# Altium PCB PCB1.PcbDoc
Units mm, origin at the board's own origin, x right, y up, seen from the top; angles counter-clockwise.
Board outline 211.71 x 173.35 mm, 3 copper layers (Top Layer, Internal Plane 1, Bottom Layer); 80 components, 62 nets, 256 pads, 0 vias.
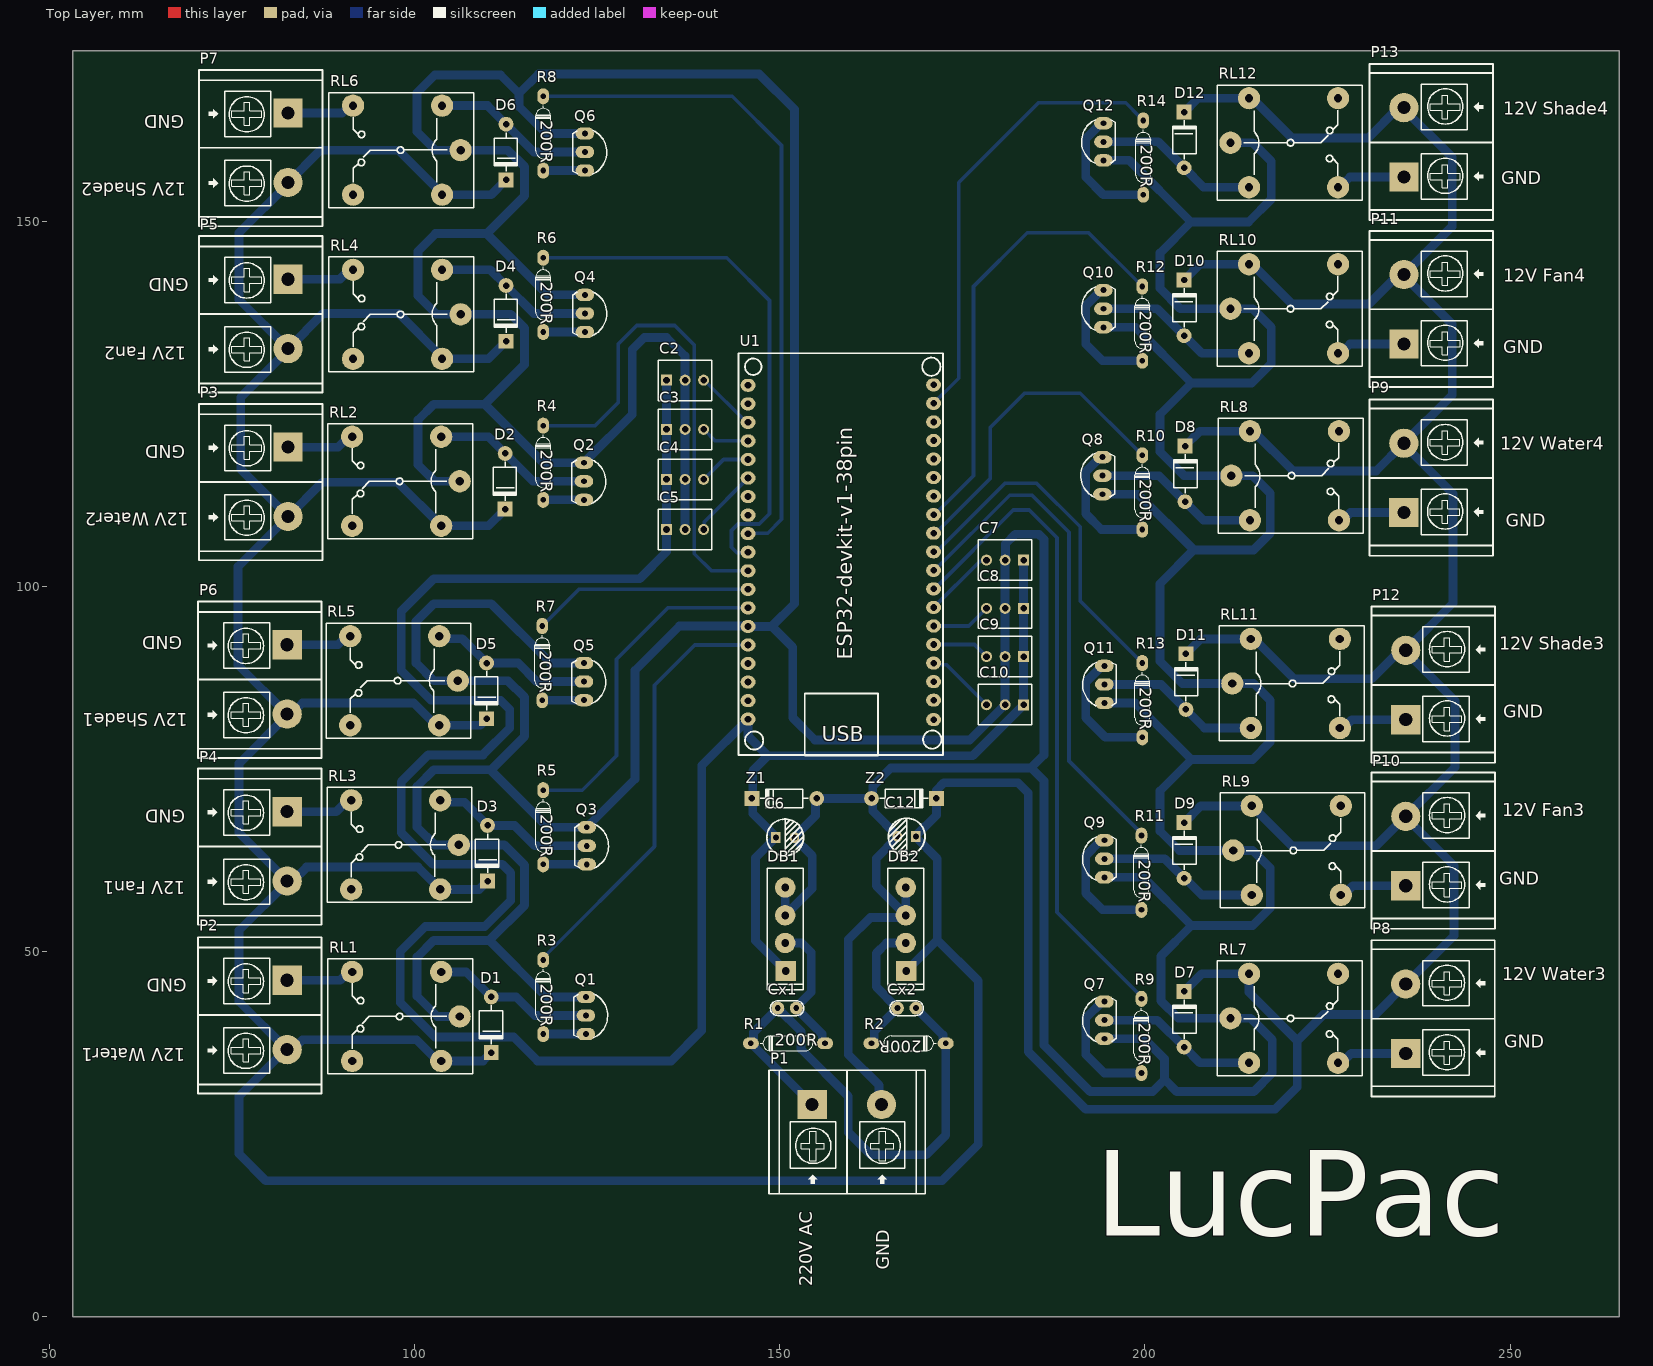
[diagram p0: Top Layer view]
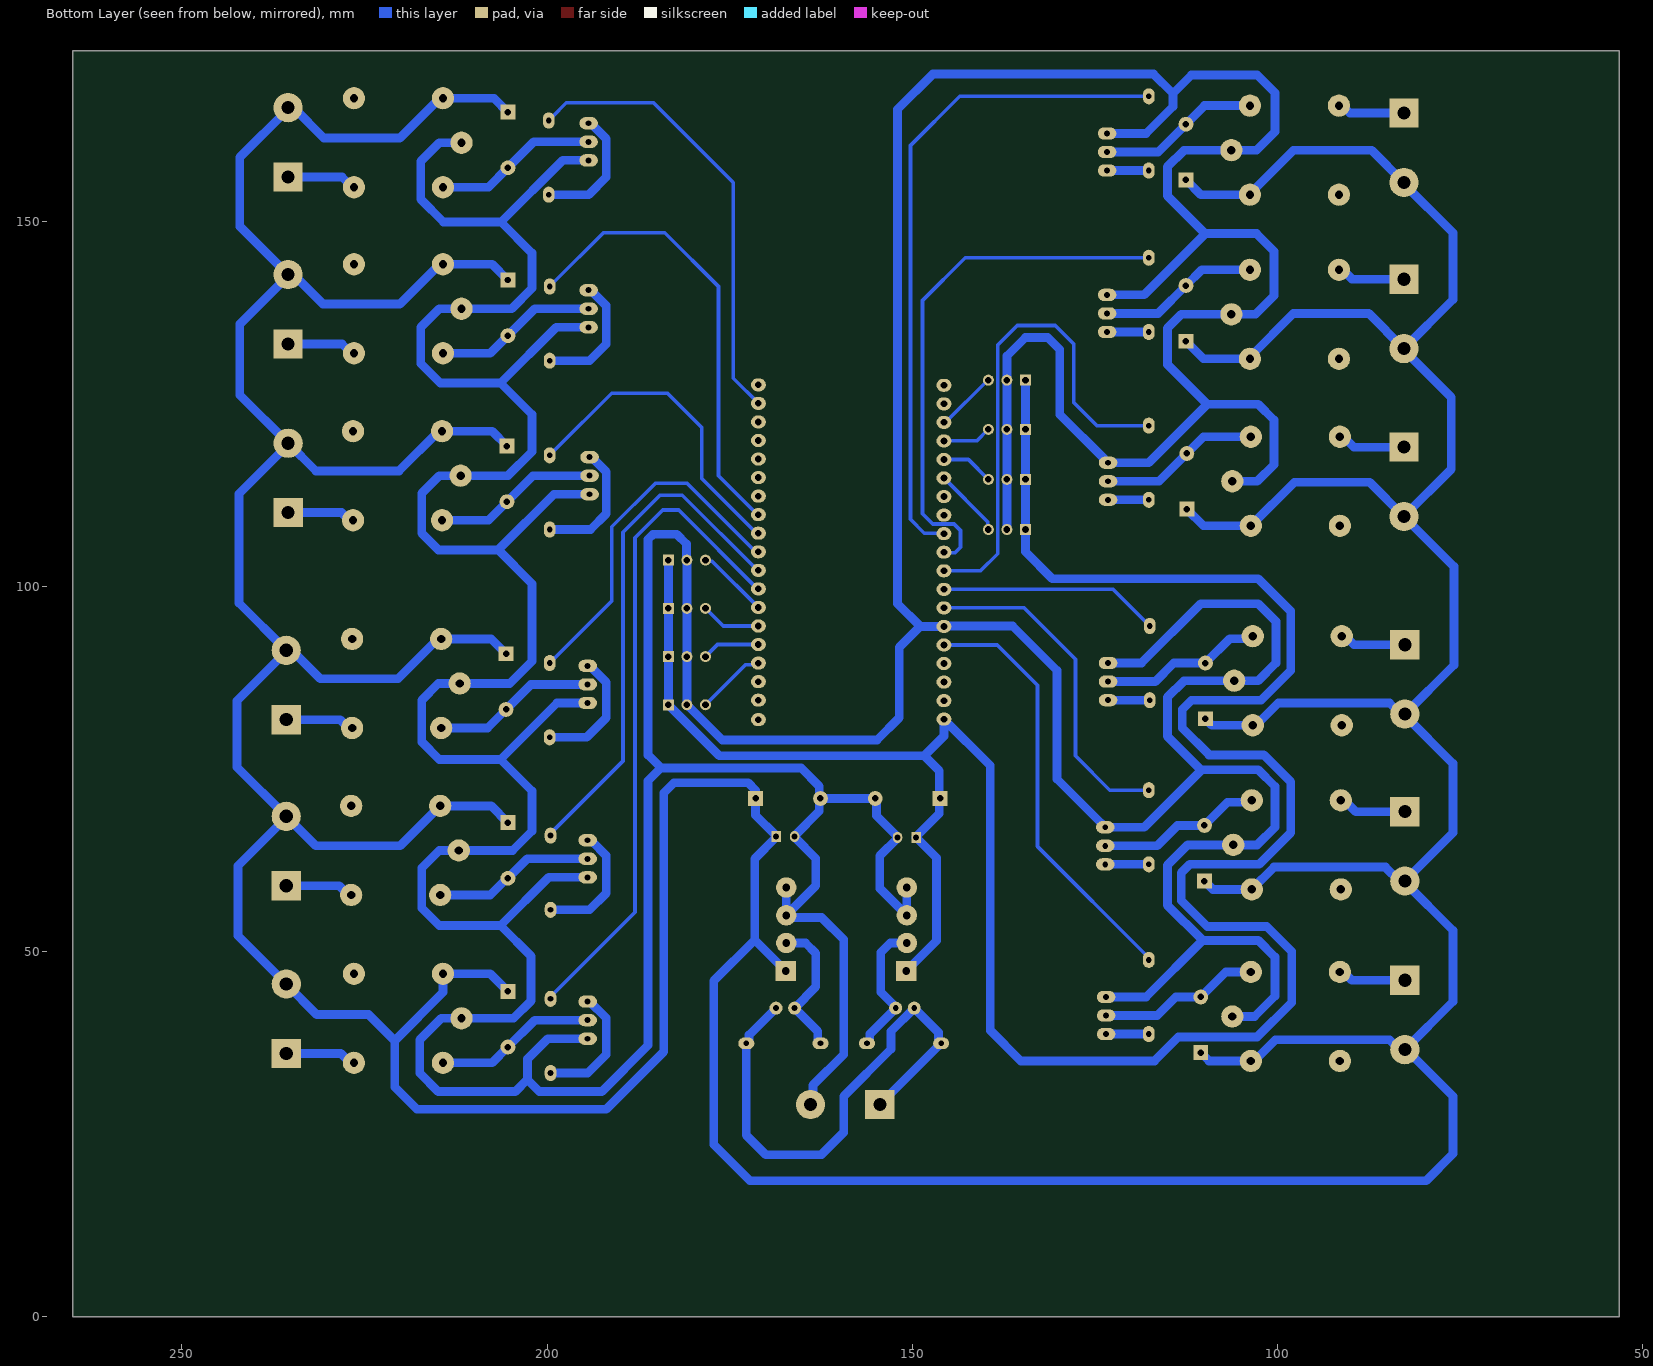
[diagram p1: Bottom Layer view, seen from below]
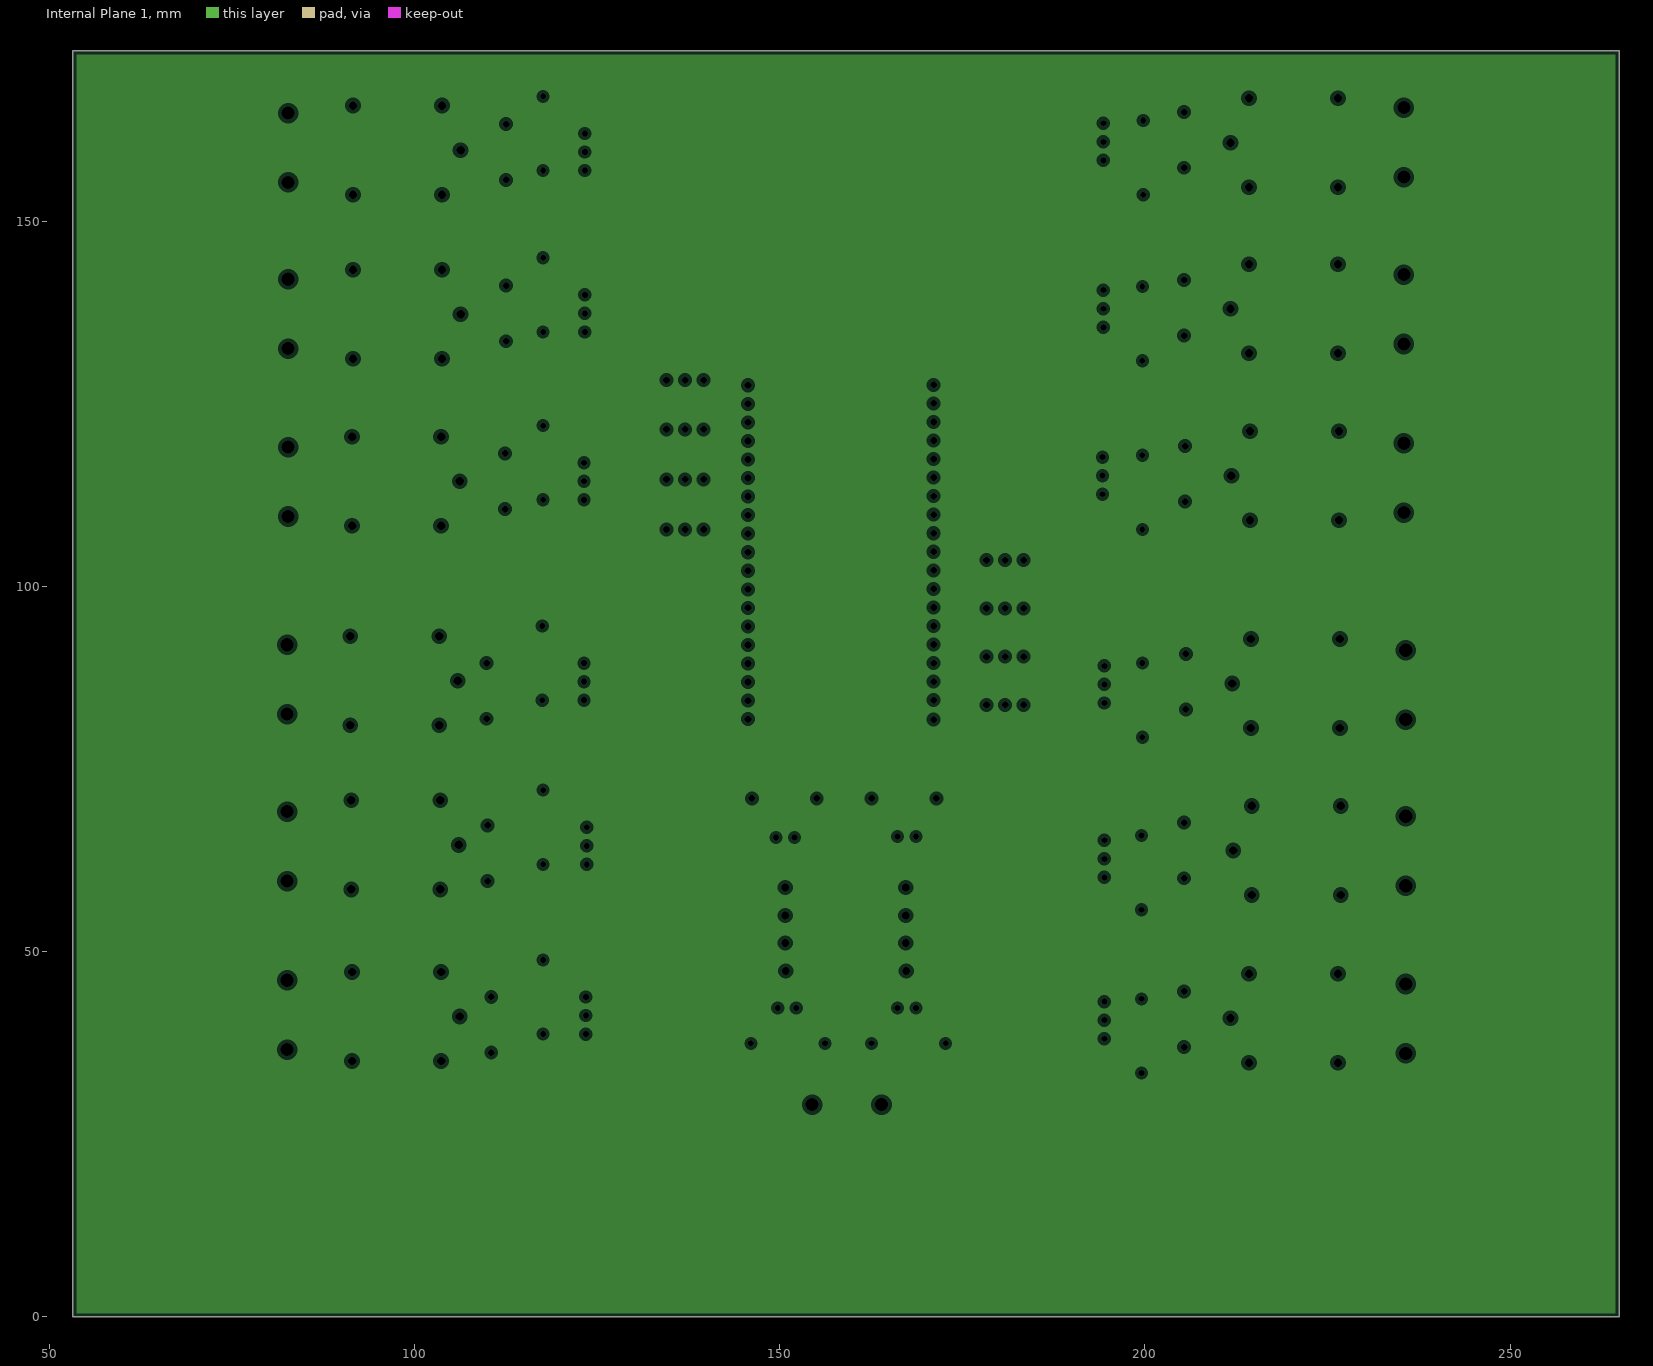
[diagram p2: Internal Plane 1, clearances drawn from the general rule]
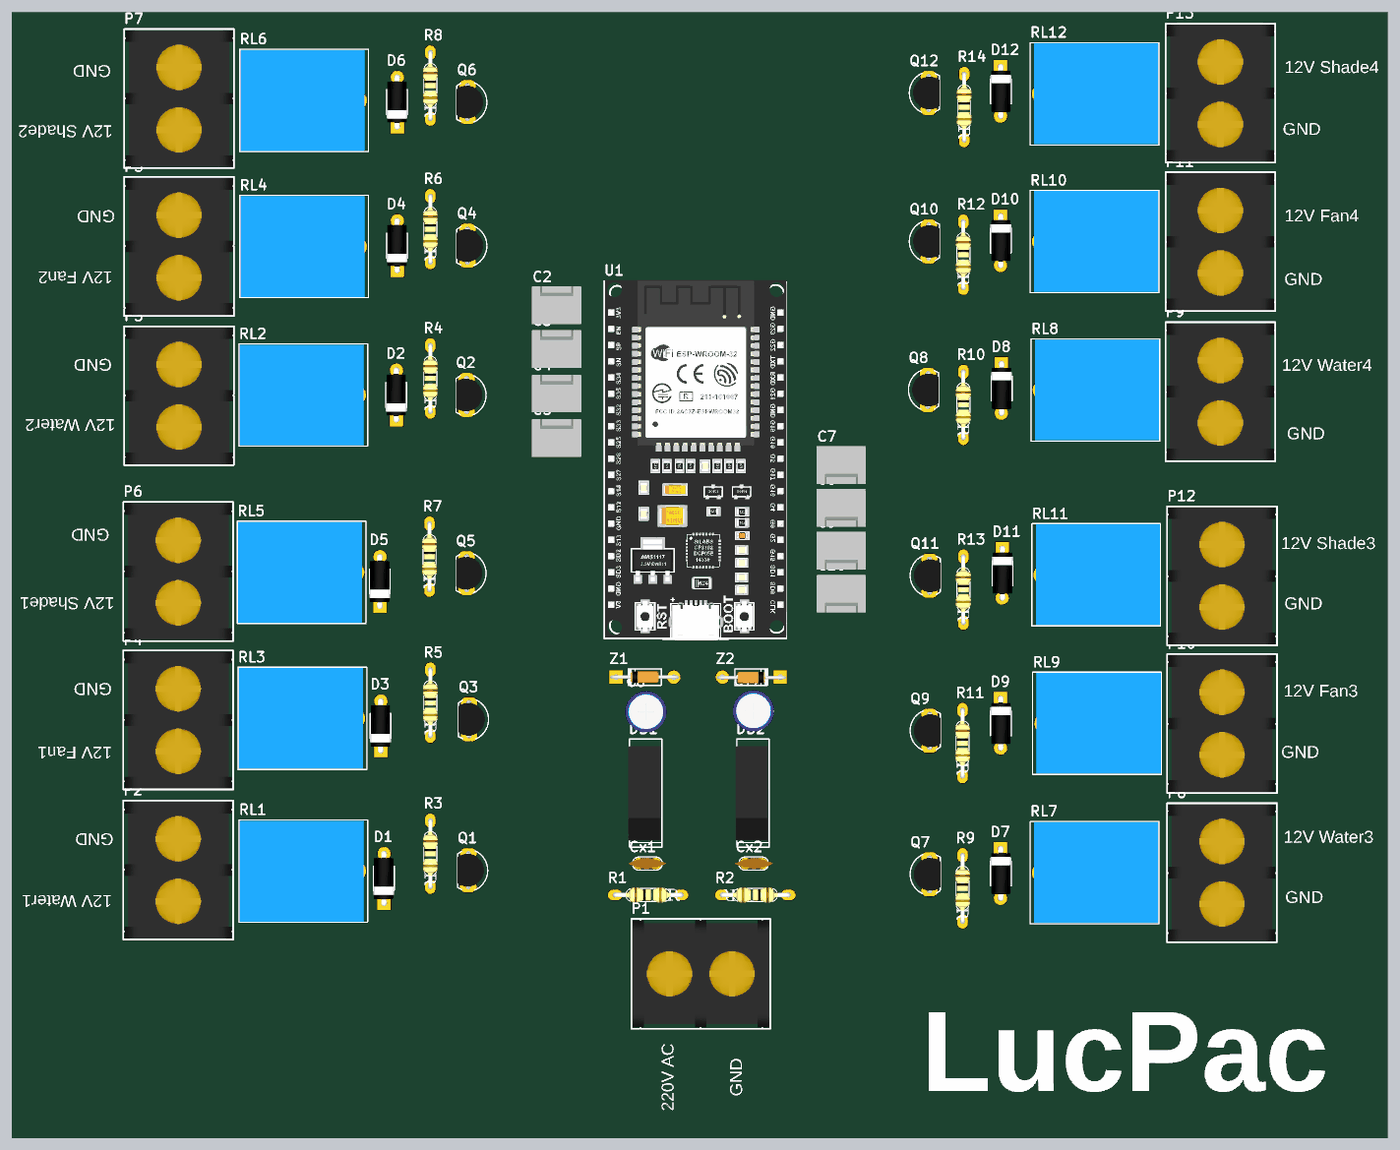
[diagram p3: 3D render of the assembled board from above, using the file's embedded part models]

## Layer stack, top to bottom
Top Solder: solder mask 0.0102, Solder Resist, Dk 3.5
Top Layer: signal copper 0.0356
Dielectric 1: dielectric 0.32, FR-4, Dk 4.8
Internal Plane 1: plane copper 0.0356
Dielectric2: dielectric 0.32, FR-4, Dk 4.8
Bottom Layer: signal copper 0.0356
Bottom Solder: solder mask 0.0102, Solder Resist, Dk 3.5

## Board outline
264.922,0 264.922,173.355 53.213,173.355 53.213,0

## Design rules (kind name [scope] priority, off if disabled: settings)
Clearance [All] p1: gap=0 ignorepadtopadclearanceinfootprint=FALSE
PlaneClearance [All] p1: clearance=0.508
PlaneConnect [All] p1: planeconnectstyle=Relief reliefexpansion=0.508 reliefentries=4 reliefconductorwidth=0.254 reliefairgap=0.254
PolygonConnect [All] p1: connectstyle=Relief reliefconductorwidth=0.254 reliefentries=4 polygonreliefangle="90 Angle" airgapwidth=0.254
RoutingVias [All] p1: holewidth=0.711 width=1.27 viastyle="Through Hole" minholewidth=0.711 minwidth=1.27 maxholewidth=0.711 maxwidth=1.27
SilkToSilkClearance [All] p1: silktosilkclearance=0
SilkToSolderMaskClearance [IsText] p1: minsilkscreentomaskgap=0 clearancetoexposedcopper=TRUE
SolderMaskExpansion [All] p1: expansion=0.102 istentingtop=FALSE
Width [All] p1: maxlimit=5 minlimit=0.3 preferedwidth=1.2
26 further rules are at their usual default settings.

## Components (designator, comment, footprint, x,y, rotation, side; value= is the part's Value field where it differs from the comment)
C2 "Header3" HDR3 134.493,128.27 r0 top
C3 "Header3" HDR3 134.493,121.539 r0 top
C4 "Header3" HDR3 134.493,114.681 r0 top
C5 "Header3" HDR3 134.493,107.823 r0 top
C6 "100uF" "tu hoa 5mm" 150.741,65.659 r0 top
C7 "Header3" HDR3 183.388,103.632 r180 top
C8 "Header3" HDR3 183.388,97.028 r180 top
C9 "Header3" HDR3 183.388,90.424 r180 top
C10 "Header3" HDR3 183.388,83.82 r180 top
C12 "100uF" "tu hoa 5mm" 167.378,65.786 r180 top
Cx1 "1uF" CN1 150.995,42.291 r0 top value=33pF
Cx2 "1uF" CN1 167.378,42.291 r180 top value=33pF
D1 "100v" "DIODE 1A" 110.49,45.085 r90 top
D2 "100v" "DIODE 1A" 112.395,119.507 r90 top
D3 "100v" "DIODE 1A" 109.982,68.58 r90 top
D4 "100v" "DIODE 1A" 112.522,142.494 r90 top
D5 "100v" "DIODE 1A" 109.855,90.805 r90 top
D6 "100v" "DIODE 1A" 112.522,164.592 r90 top
D7 "100v" "DIODE 1A" 205.359,35.687 r270 top
D8 "100v" "DIODE 1A" 205.486,110.363 r270 top
D9 "100v" "DIODE 1A" 205.359,58.801 r270 top
D10 "100v" "DIODE 1A" 205.359,133.096 r270 top
D11 "100v" "DIODE 1A" 205.613,81.915 r270 top
D12 "100v" "DIODE 1A" 205.359,156.083 r270 top
DB1 "Diode Brideg" "CAU 1A" 150.766,47.371 r90 top value="Cau 1A"
DB2 "Diode Brideg" "CAU 1A" 167.276,47.371 r90 top value="Cau 1A"
P1 "HB9500-2P" HB9500-2P 154.432,29.083 r0 top
P2 "HB9500-2P" HB9500-2P 82.55,46.101 r270 top
P3 "HB9500-2P" HB9500-2P 82.677,119.101 r270 top
P4 "HB9500-2P" HB9500-2P 82.55,69.19 r270 top
P5 "HB9500-2P" HB9500-2P 82.677,142.088 r270 top
P6 "HB9500-2P" HB9500-2P 82.55,92.05 r270 top
P7 "HB9500-2P" HB9500-2P 82.677,164.846 r270 top
P8 "HB9500-2P" HB9500-2P 235.704,36.093 r90 top
P9 "HB9500-2P" HB9500-2P 235.45,110.134 r90 top
P10 "HB9500-2P" HB9500-2P 235.712,59.055 r90 top
P11 "HB9500-2P" HB9500-2P 235.458,133.223 r90 top
P12 "HB9500-2P" HB9500-2P 235.712,81.788 r90 top
P13 "HB9500-2P" HB9500-2P 235.458,156.083 r90 top
Q1 "C1815" TO92 123.444,41.275 r270 top value=C9014
Q2 "C1815" TO92 123.19,114.427 r270 top value=C9014
Q3 "C1815" TO92 123.571,64.516 r270 top value=C9014
Q4 "C1815" TO92 123.317,137.414 r270 top value=C9014
Q5 "C1815" TO92 123.19,86.995 r270 top value=C9014
Q6 "C1815" TO92 123.317,159.512 r270 top value=C9014
Q7 "C1815" TO92 194.437,40.64 r90 top value=C9014
Q8 "C1815" TO92 194.183,115.189 r90 top value=C9014
Q9 "C1815" TO92 194.437,62.738 r90 top value=C9014
Q10 "C1815" TO92 194.31,138.049 r90 top value=C9014
Q11 "C1815" TO92 194.437,86.614 r90 top value=C9014
Q12 "C1815" TO92 194.31,160.909 r90 top value=C9014
R1 "100K" "DIEN TRO 1/4 W" 146.042,37.465 r0 top value=R
R2 "100K" "DIEN TRO 1/4 W" 172.712,37.465 r180 top value=R
R3 "500" "DIEN TRO 1/4 W" 117.602,48.895 r270 top value=R
R4 "500" "DIEN TRO 1/4 W" 117.602,122.047 r270 top value=R
R5 "500" "DIEN TRO 1/4 W" 117.602,72.136 r270 top value=R
R6 "500" "DIEN TRO 1/4 W" 117.602,145.034 r270 top value=R
R7 "500" "DIEN TRO 1/4 W" 117.475,94.615 r270 top value=R
R8 "500" "DIEN TRO 1/4 W" 117.602,167.132 r270 top value=R
R9 "500" "DIEN TRO 1/4 W" 199.517,43.561 r270 top value=R
R10 "500" "DIEN TRO 1/4 W" 199.644,117.983 r270 top value=R
R11 "500" "DIEN TRO 1/4 W" 199.517,65.913 r270 top value=R
R12 "500" "DIEN TRO 1/4 W" 199.644,141.097 r270 top value=R
R13 "500" "DIEN TRO 1/4 W" 199.644,89.535 r270 top value=R
R14 "500" "DIEN TRO 1/4 W" 199.771,163.83 r270 top value=R
RL1 "Relay 10A/12V" "RELAY 5" 97.917,41.148 r180 top value="Relay SPDT, 10A, 12V"
RL2 "Relay 10A/12V" "RELAY 5" 97.917,114.427 r180 top value="Relay SPDT, 10A, 12V"
RL3 "Relay 10A/12V" "RELAY 5" 97.79,64.643 r180 top value="Relay SPDT, 10A, 12V"
RL4 "Relay 10A/12V" "RELAY 5" 98.044,137.287 r180 top value="Relay SPDT, 10A, 12V"
RL5 "Relay 10A/12V" "RELAY 5" 97.663,87.122 r180 top value="Relay SPDT, 10A, 12V"
RL6 "Relay 10A/12V" "RELAY 5" 98.044,159.766 r180 top value="Relay SPDT, 10A, 12V"
RL7 "Relay 10A/12V" "RELAY 5" 219.964,40.894 r0 top value="Relay SPDT, 10A, 12V"
RL8 "Relay 10A/12V" "RELAY 5" 220.091,115.189 r0 top value="Relay SPDT, 10A, 12V"
RL9 "Relay 10A/12V" "RELAY 5" 220.345,63.881 r0 top value="Relay SPDT, 10A, 12V"
RL10 "Relay 10A/12V" "RELAY 5" 219.964,138.049 r0 top value="Relay SPDT, 10A, 12V"
RL11 "Relay 10A/12V" "RELAY 5" 220.218,86.741 r0 top value="Relay SPDT, 10A, 12V"
RL12 "Relay 10A/12V" "RELAY 5" 219.964,160.782 r0 top value="Relay SPDT, 10A, 12V"
U1 "ESP32-DEVKI-V1.0-PIN38" ESP32-DEVKIT-V1.0-38PIN 158.361,104.394 r0 top
Z1 "5.1V" D1A 155.067,70.993 r0 top
Z2 "12V" D1A 162.56,70.993 r180 top

## Footprints (in the part's own frame and the unit in brackets; to place one, negate y for a bottom-side part, rotate by r counter-clockwise, add the part's x,y. Pads: shape width x height; smd on the part's side, far side on the other; paste and mask are expansions set on the pad)
"CAU 1A" [mil] "CAU 1A DET"
  rect 110x110 hole 42: 1(0,-2)
  round 110 hole 42: 2(151,1) 3(300,1) 4(450,1)
  silkscreen extent -101,-97 555,99, body extent -62,-90 512,107, height 453
CN1 [mil]
  round 70 hole 31: 1(-50,0) 2(50,0)
  silkscreen extent -90,-40 91,40, body extent -115,-33 115,33, height 265
D1A [mil] "Diode 1A, W 100mil, L 350mil"
  round 80 hole 35: 1(0,0)
  rect 80x80 hole 35: 2(-350,0)
  silkscreen extent -305,-50 -45,50, body extent -386,-33 34,36, height 84
"DIEN TRO 1/4 W" [mm]
  oval 2.2x1.6 hole 0.787: 1(0,0) 2(10.16,0)
  silkscreen extent 1.26,-1.02 8.88,1.02, body extent -0.3,-1.16 10.46,1.16, height 2.93
"DIODE 1A" [mil] "Diode 1A"
  round 80 hole 35: 1(-50,0)
  rect 80x80 hole 35: 2(-350,0)
  silkscreen extent -305,-61 -95,65, body extent -366,-61 -34,65, height 122
ESP32-DEVKIT-V1.0-38PIN [mil] "DEVKIT 38 PIN"
  oval 80x70 hole 36: 1(-500,912.59) 2(-500,812.59) 3(-500,712.59) 4(-500,612.59) 5(-500,512.59) 6(-500,412.59) 7(-500,312.59) 8(-500,212.59) 9(-500,112.59) 10(-500,12.59) 11(-500,-87.41) 12(-500,-187.41) 13(-500,-287.41) 14(-500,-387.41) 15(-500,-487.41) 16(-500,-587.41) 17(-500,-687.41) 18(-500,-787.41) 19(-500,-887.41) 20(500,-890.09) 21(500,-785.09) 22(500,-685.09) 23(500,-585.09) 24(500,-485.09) 25(500,-385.09) 26(500,-285.09) 27(500,-185.09) 28(500,-85.09) 29(500,14.91) 30(500,114.91) 31(500,214.91) 32(500,314.91) 33(500,414.91) 34(500,514.91) 35(500,614.91) 36(500,714.91) 37(500,814.91) 38(500,914.91)
  silkscreen extent -551,-1085 551,1085, body extent -547,-1092 555,1092, height 269
HB9500-2P [mm]
  rect 4x4 hole 1.8: 1(0,0)
  round 4 hole 1.8: 2(9.5,0)
  silkscreen extent -5.9,-12.2 15.49,4.7, body extent -5.72,-12 15.32,4.5, height 18.51
HDR3 [mm] "Connector; Header; 3 Position"
  rect 1.5x1.5 hole 0.9: 1(0,0)
  round 1.5 hole 0.9: 2(2.54,0) 3(5.08,0)
  silkscreen extent -1.14,-2.79 6.22,2.74, body extent -1.27,-2.92 6.35,2.88, height 11.72
"RELAY 5" [mil] "Reley DPDT, 8 pin, 1A, W400mil, L800mil,H 300mil"
  round 120 hole 45: 1(-325,0) 2(255,240) 3(255,-240) 4(-225,-240) 5(-225,240)
  silkscreen extent -395,-310 385,310, body extent -371,-304 381,306, height 602
TO92 [mil] "TO-92"
  oval 66x100 hole 32: 1(-100,0) 2(0,0) 3(100,0)
  silkscreen extent -117,-65 120,118, body extent -109,-66 109,95, height 245
"tu hoa 5mm" [mm]
  rect 1.3x1.5 hole 0.8: 1(-1.27,0)
  oval 1.3x1.5 hole 0.8: 2(1.27,0)
  silkscreen extent -2.51,-2.51 2.51,2.51, body extent -3.12,-3.18 3.23,3.18, height 14.55

## Part data
C2 C3 C4 C5 C7 C8 C9 C10: "Header IDC, 3 x 1 Pin Vertical 2.54mm Pitch (Non-Boxed, Male)", Manufacturer="W¨¹rth Elektronik eiSos GmbH", partNo=613002143121, ComponentLink1 Description=Manufacturer, ComponentLink1URL=http://www.we-online.com, ComponentLink2 Description=Datasheet, ComponentLink2URL=http://katalog.we-online.de/em/datasheet/6130xx143121.pdf, Created by="Karrer Zheng", Created Date="29 March 2013", NoPins=02
C6 C12: library part "Tu Hoa 100uF 16V 5x7", "Cắm", Chung_Loai=Cắm, Don_Vi=Con, Ma_Hang=MH001347, So_Chan=2, Ten_Linh_Kien="Tụ Hóa 100uF 16V 5x7MM"
Cx1 Cx2: library part CAP-DIP, "Cremic For Xtal 1pF => 100pF"
D1 D2 D3 D4 D5 D6 D7 D8 D9 D10 D11 D12: library part "Diode 1N4007", "Cắm", Chung_Loai=Cắm, Don_Vi=Con, Ma_Hang=MH001063, Ten_Linh_Kien="Diode 1N4007 1A (DIP)"
DB1 DB2: library part DB, "Convert AC to DC voltage, 4 pin"
P1 P2 P3 P4 P5 P6 P7 P8 P9 P10 P11 P12 P13: "Terminal Block, Header, 2P, 15A, 300VAC Rohs Compliant: Yes"
Q1 Q2 Q3 Q4 Q5 Q6 Q7 Q8 Q9 Q10 Q11 Q12: library part "Trans C1815 DIP", "NPN transistor"
R1 R2 R3 R4 R5 R6 R7 R8 R9 R10 R11 R12 R13 R14: library part "Res 1/4 W", "Resistor", LatestRevisionDate=17-Jul-2002, LatestRevisionNote="Re-released for DXP Platform.", PackageReference=AXIAL-0.4, Published=8-Jun-2000, Publisher="Altium Limited"
RL1 RL2 RL3 RL4 RL5 RL6 RL7 RL8 RL9 RL10 RL11 RL12: library part "Relay 5", "Relay SPDT,10A - 12VDC 5 Pin"
Z1 Z2: library part "Diode Zener", "Diode  Zener"

## Nets (pads, with @x,y where several pads share a name; then routed paths per layer and width w, separated by ;. In a path a pad name is that pad's centre, name@x,y a point inside that pad or via, vN(x,y) a via of type N, cw(c..) or ccw(c..) an arc to the next point about the centre after c; other vN are vias at no path point)
5V: C2.1 C3.1 C4.1 C5.1 C6.1 C7.1 C8.1 C9.1 C10.1 DB1.1 U1.19 Z1.2 | length 351.9
  Bottom Layer w1.2: C2.1 C3.1 C4.1 C5.1 134.493,104.775 130.81,101.092 102.616,101.092 98.171,96.647 98.171,88.519 102.235,84.455 111.76,84.455 113.03,83.185 113.03,80.645 109.347,76.962 101.854,76.962 98.171,73.279 98.171,66.294 102.489,61.976 112.014,61.976 113.157,60.833 113.157,57.023 109.601,53.467 101.473,53.467 98.044,50.038 98.044,43.053 102.743,38.354 113.538,38.354 116.84,35.052 135.128,35.052 139.319,39.243 139.319,75.512 U1.19 145.661,79.51 148.336,76.835 ; DB1.1 146.685,51.503 146.685,62.873 C6.1 149.421,65.709 149.421,65.809 146.296,68.934 146.296,70.874 Z1.2 146.304,71.12 146.304,74.803 148.336,76.835 ; C7.1 C8.1 C9.1 C10.1 176.403,76.835 148.336,76.835
12V: C12.1 D1.2 D2.2 D3.2 D4.2 D5.2 D6.2 D7.2 D8.2 D9.2 D10.2 D11.2 D12.2 DB2.1 P2.2 P3.2 P4.2 P5.2 P6.2 P7.2 P8.2 P9.2 P10.2 P11.2 P12.2 P13.2 RL1.5 RL2.5 RL3.5 RL4.5 RL5.5 RL6.5 RL7.5 RL8.5 RL9.5 RL10.5 RL11.5 RL12.5 Z2.2 | length 980.9
  Bottom Layer w1.2: RL1.5@103.179,35.052 100.258,37.973 84.653,37.973 83.281,36.601 P2.2 ; RL1.5 109.347,35.052 D1.2 ; D5.2 108.966,81.026 RL5.5 102.925,81.026 99.877,84.074 84.653,84.074 83.129,82.55 P6.2 ; D3.2 108.839,58.547 RL3.5 100.457,61.595 85.213,61.595 83.308,59.69 P4.2 ; D2.2 110.109,108.331 RL2.5 97.663,114.3 87.376,114.3 P3.2 ; D4.2 110.109,131.191 RL4.5 103.759,131.445 97.79,137.414 87.503,137.414 P5.2 ; D6.2 110.49,153.67 RL6.5 103.759,153.797 97.79,159.766 87.097,159.766 P7.2 82.677,155.172 75.946,148.441 75.946,139.319 P5.2 ; DB2.1 171.577,51.621 ; D7.2 207.772,46.99 RL7.5 214.249,44.45 220.853,37.846 ; D9.2 207.645,69.977 RL9.5 220.091,64.516 231.673,64.516 P10.2 ; D10.2 207.518,144.145 RL10.5 214.702,144.145 220.163,138.684 230.661,138.684 234.7,142.723 P11.2 ; D12.2 207.264,166.878 RL12.5 214.702,166.878 220.163,161.417 230.534,161.417 234.7,165.583 P13.2 235.458,165.409 242.062,158.805 242.062,149.327 P11.2 ; D8.2 207.518,121.285 RL8.5 214.829,121.285 220.29,115.824 231.64,115.824 P9.2 ; D11.2 207.645,92.837 RL11.5 214.956,92.837 220.417,87.376 231.042,87.376 234.954,91.288 P12.2 ; P2.2 82.321,36.601 75.946,30.226 75.946,22.352 79.629,18.669 172.212,18.669 177.165,23.622 177.165,46.033 171.577,51.621 ; P2.2 75.946,43.205 75.946,52.912 82.55,59.516 P4.2 ; P4.2 75.946,66.294 75.946,75.772 82.55,82.376 P6.2 ; P6.2 75.819,89.281 75.819,102.743 P3.2 ; P3.2 76.2,116.078 76.2,125.937 82.677,132.414 P5.2 ; 171.577,51.621 171.577,62.757 168.648,65.686 C12.1 168.698,65.836 168.698,65.955 171.45,68.707 Z2.2 171.45,72.136 172.466,73.152 182.626,73.152 184.023,71.755 184.023,36.322 191.897,28.448 217.805,28.448 220.853,31.496 220.853,37.846 ; 220.853,37.846 224.409,41.402 231.513,41.402 P8.2 242.316,52.205 242.316,61.777 235.712,68.381 P10.2 ; P9.2 242.062,126.246 242.062,135.945 235.458,142.549 P11.2 ; P9.2 235.45,119.46 242.189,112.721 242.189,97.765 P12.2 ; P10.2 242.443,75.286 242.443,84.383 235.712,91.114 P12.2
220V: Cx1.1 Cx2.1 P1.1 R1.1 R2.1 | length 74.2
  Bottom Layer w1.2: R1.1 R1.1@146.234,37.465 ; P1.1 146.419,37.096 146.419,37.28 R1.1@146.234,37.465 ; Cx2.1 172.335,38.604 172.335,37.65 172.52,37.465 R2.1 172.712,24.884 170.053,22.225 162.433,22.225 159.385,25.273 159.385,30.226 152.908,36.703 152.908,39.108 Cx1.1 146.419,38.985 146.419,37.65 R1.1@146.234,37.465
Fan1: R5.1 U1.13 | length 46.1
  Bottom Layer w0.5: R5.1 122.936,72.136 127.635,76.835 127.635,90.043 134.686,97.094 U1.13
Fan2: R6.1 U1.10 | length 73.7
  Bottom Layer w0.5: R6.1 142.748,145.034 148.59,139.192 148.59,109.982 147.193,108.585 144.272,108.585 143.383,107.696 143.383,105.41 144.145,104.648 145.595,104.648 U1.10
Fan3: R11.1 U1.28 | length 70.5
  Bottom Layer w0.5: U1.28 171.188,102.233 181.477,112.522 184.531,112.522 189.611,107.442 189.611,76.119 199.517,66.213 R11.1
Fan4: R12.1 U1.31 | length 62.8
  Bottom Layer w0.5: U1.31 171.188,109.853 176.53,115.195 176.53,141.097 183.896,148.463 192.278,148.463 199.134,141.607 199.136,141.607 199.644,141.099 R12.1
GND: C2.2 C3.2 C4.2 C5.2 C6.2 C7.2 C8.2 C9.2 C10.2 C12.2 DB1.3 DB1.4 DB2.3 DB2.4 P1.2 Q1.1 Q2.1 Q3.1 Q4.1 Q5.1 Q6.1 Q7.1 Q8.1 Q9.1 Q10.1 Q11.1 Q12.1 RL1.1 RL2.1 RL3.1 RL4.1 RL5.1 RL6.1 RL7.1 RL8.1 RL9.1 RL10.1 RL11.1 RL12.1 U1.14 Z1.1 Z2.1 | length 1167.4
  Bottom Layer w1.2: RL1.1 103.124,41.148 100.33,43.942 100.33,49.276 102.616,51.562 110.236,51.562 ; RL2.1 102.743,114.427 100.457,116.713 100.457,122.809 102.616,124.968 109.601,124.968 ; Q5.1 118.618,89.535 110.49,97.663 102.616,97.663 100.203,95.25 100.203,89.535 102.616,87.122 RL5.1 112.776,87.122 115.062,84.836 115.062,79.502 110.426,74.867 ; Q4.1 118.237,139.954 109.855,148.336 ; Q6.1 117.983,162.052 114.3,165.735 114.3,167.513 ; Q1.1 117.983,43.815 110.236,51.562 ; C5.2 C4.2 C3.2 C2.2 137.033,131.572 134.493,134.112 131.445,134.112 129.794,132.461 129.794,123.571 123.713,117.49 123.713,117.187 123.493,116.967 Q2.1 117.602,116.967 109.601,124.968 ; DB1.4 DB1.3 154.432,58.682 154.432,63.138 152.011,65.559 C6.2 152.011,65.759 154.908,68.656 154.908,70.834 Z1.1 Z2.1 ; P1.2 163.6,29.415 163.6,31.726 159.385,35.941 159.385,51.689 162.382,54.686 166.946,54.686 DB2.3 ; DB2.4 DB2.3 ; Q8.1 199.058,112.649 206.678,105.029 ; Q10.1 198.755,135.509 206.375,127.889 ; Q12.1 197.866,158.369 206.311,149.923 ; Q7.1 199.898,38.1 202.692,35.306 202.692,32.512 ; Q9.1 199.771,60.198 206.375,53.594 ; Q11.1 198.628,84.074 206.375,76.327 ; RL12.1 214.757,160.782 217.297,158.242 217.297,153.035 214.185,149.923 206.311,149.923 ; 109.601,124.968 115.062,130.429 115.062,135.382 113.157,137.287 RL4.1 102.997,137.287 100.457,139.827 100.457,145.923 102.87,148.336 109.855,148.336 ; 109.855,148.336 115.062,153.543 115.062,157.48 112.776,159.766 RL6.1 102.87,159.766 100.33,162.306 100.33,167.64 102.743,170.053 111.76,170.053 114.3,167.513 ; 110.236,51.562 115.062,56.388 115.062,61.849 112.268,64.643 RL3.1 102.743,64.643 100.33,67.056 100.33,72.644 102.616,74.93 110.363,74.93 110.426,74.867 ; 110.426,74.867 118.237,67.056 Q3.1 123.874,67.056 124.094,67.276 124.094,67.579 130.175,73.66 130.175,88.519 136.271,94.615 145.6,94.615 U1.14 148.905,94.554 ; 114.3,167.513 116.967,170.18 147.193,170.18 152.019,165.354 152.019,97.668 148.905,94.554 ; 148.905,94.554 151.765,91.694 151.765,82.042 154.813,78.994 176.022,78.994 C10.2 C9.2 C8.2 C7.2 180.905,103.689 180.905,105.848 182.245,107.188 185.479,107.188 186.182,106.485 186.182,76.962 184.404,75.184 ; Z2.1 162.719,71.152 162.719,72.676 165.227,75.184 184.404,75.184 ; Z2.1 162.719,70.834 162.719,69.275 166.108,65.886 C12.2 166.108,65.686 163.195,62.773 163.195,59.047 DB2.3 ; 184.404,75.184 186.182,73.406 186.182,37.211 192.532,30.861 201.041,30.861 202.692,32.512 ; 202.692,32.512 204.343,30.861 214.884,30.861 217.424,33.401 217.424,37.973 214.503,40.894 RL7.1 204.597,40.894 202.184,43.307 202.184,49.403 206.375,53.594 ; 206.311,149.923 202.057,145.669 202.057,140.843 204.851,138.049 RL10.1 214.757,138.049 217.297,135.509 217.297,130.556 214.63,127.889 206.375,127.889 ; 206.375,53.594 214.757,53.594 217.17,56.007 217.17,61.468 214.757,63.881 RL9.1 204.724,63.881 202.057,66.548 202.057,72.009 206.375,76.327 ; 206.375,76.327 214.757,76.327 217.17,78.74 217.17,84.455 214.884,86.741 RL11.1 205.105,86.741 202.057,89.789 202.057,100.408 206.678,105.029 ; 206.375,127.889 202.057,123.571 202.057,118.491 205.359,115.189 RL8.1 214.757,115.189 217.17,112.776 217.17,107.315 214.884,105.029 206.678,105.029
Humi_Temp_sensor1: C7.3 U1.26 | length 9.9
  Bottom Layer w0.5: U1.26 177.363,103.455 178.131,103.455 C7.3
Humi_Temp_sensor2: C8.3 U1.25 | length 8.2
  Bottom Layer w0.5: U1.25 175.893,94.613 C8.3
Humi_Temp_sensor3: C9.3 U1.24 | length 7.9
  Bottom Layer w0.5: U1.24 176.659,92.073 C9.3
Humi_Temp_sensor4: C10.3 U1.23 | length 9.6
  Bottom Layer w0.5: U1.23 171.293,89.301 172.827,89.301 C10.3
Light_sensor1: C2.3 U1.3 | length 8.5
  Bottom Layer w0.5: C2.3 139.665,128.27 145.442,122.494 U1.3
Light_sensor2: C3.3 U1.4 | length 6.7
  Bottom Layer w0.5: C3.3 141.158,119.954 U1.4
Light_sensor3: C4.3 U1.5 | length 7.2
  Bottom Layer w0.5: C4.3 142.306,117.414 U1.5
Light_sensor4: C5.3 U1.6 | length 9.6
  Bottom Layer w0.5: C5.3 139.652,107.902 139.652,108.865 U1.6
NetCx1_2: Cx1.2 DB1.2 R1.2 | length 19.1
  Bottom Layer w1.2: DB1.2 153.01,51.206 154.305,49.911 154.305,44.487 152.265,42.447 Cx1.2 155.825,38.731 155.825,37.65 156.01,37.465 R1.2
NetCx2_2: Cx2.2 DB2.2 R2.2 | length 19.8
  Bottom Layer w1.2: R2.2 162.744,37.465 162.929,37.65 162.929,39.112 Cx2.2 163.195,45.204 163.195,49.784 164.617,51.206 DB2.2
NetD1_1: D1.1 Q1.2 RL1.4 | length 22.3
  Bottom Layer w1.2: RL1.4 107.061,47.244 D1.1 113.919,43.815 116.459,41.275 Q1.2
NetD2_1: D2.1 Q2.2 RL2.4 | length 22.1
  Bottom Layer w1.2: RL2.4 110.109,120.523 D2.1 116.205,114.427 Q2.2
NetD3_1: D3.1 Q3.2 RL3.4 | length 22.6
  Bottom Layer w1.2: RL3.4 103.781,70.463 106.829,70.463 D3.1 113.665,67.31 116.459,64.516 Q3.2
NetD4_1: D4.1 Q4.2 RL4.4 | length 22
  Bottom Layer w1.2: RL4.4 110.363,143.383 D4.1 116.332,137.414 Q4.2
NetD5_1: D5.1 Q5.2 RL5.4 | length 22.4
  Bottom Layer w1.2: RL5.4 103.732,92.864 106.526,92.864 D5.1 114.173,89.535 116.713,86.995 Q5.2
NetD6_1: D6.1 Q6.2 RL6.4 | length 22.2
  Bottom Layer w1.2: RL6.4 109.982,165.862 D6.1 116.332,159.512 Q6.2
NetD7_1: D7.1 Q7.2 RL7.4 | length 22.2
  Bottom Layer w1.2: Q7.2 201.676,40.64 D7.1 207.518,34.798 RL7.4
NetD8_1: D8.1 Q8.2 RL8.4 | length 22.7
  Bottom Layer w1.2: Q8.2 201.93,115.189 D8.1 208.026,109.093 RL8.4
NetD9_1: D9.1 Q9.2 RL9.4 | length 22.2
  Bottom Layer w1.2: Q9.2 202.692,62.738 D9.1 205.477,60.071 207.763,57.785 RL9.4
NetD10_1: D10.1 Q10.2 RL10.4 | length 22.5
  Bottom Layer w1.2: Q10.2 201.676,138.049 D10.1 207.772,131.953 RL10.4
NetD11_1: D11.1 Q11.2 RL11.4 | length 22.5
  Bottom Layer w1.2: Q11.2 202.184,86.614 208.153,80.645 RL11.4
NetD12_1: D12.1 Q12.2 RL12.4 | length 22.5
  Bottom Layer w1.2: Q12.2 201.803,160.909 D12.1 208.026,154.686 RL12.4
NetP2_1: P2.1 RL1.3 | length 9.4
  Bottom Layer w1.2: P2.1 89.797,46.101 90.94,47.244 RL1.3
NetP3_1: P3.1 RL2.3 | length 9.4
  Bottom Layer w1.2: P3.1 89.518,119.101 90.94,120.523 RL2.3
NetP4_1: P4.1 RL3.3 | length 9.4
  Bottom Layer w1.2: P4.1 89.264,69.19 90.813,70.739 RL3.3
NetP5_1: P5.1 RL4.3 | length 9.4
  Bottom Layer w1.2: P5.1 89.772,142.088 91.067,143.383 RL4.3
NetP6_1: P6.1 RL5.3 | length 9.1
  Bottom Layer w1.2: P6.1 89.518,92.05 90.686,93.218 RL5.3
NetP7_1: P7.1 RL6.3 | length 9.3
  Bottom Layer w1.2: P7.1 90.051,164.846 91.067,165.862 RL6.3
NetP8_1: P8.1 RL7.3 | length 9.8
  Bottom Layer w1.2: RL7.3 226.941,34.798 228.236,36.093 P8.1
NetP9_1: P9.1 RL8.3 | length 9.3
  Bottom Layer w1.2: RL8.3 227.068,109.093 228.109,110.134 P9.1
NetP10_1: P10.1 RL9.3 | length 9.4
  Bottom Layer w1.2: RL9.3 227.179,57.785 228.449,59.055 P10.1
NetP11_1: P11.1 RL10.3 | length 9.5
  Bottom Layer w1.2: RL10.3 226.798,131.953 228.068,133.223 P11.1
NetP12_1: P12.1 RL11.3 | length 9.5
  Bottom Layer w1.2: RL11.3 227.179,80.645 228.322,81.788 P12.1
NetP13_1: P13.1 RL12.3 | length 9.6
  Bottom Layer w1.2: RL12.3 226.671,154.686 228.068,156.083 P13.1
NetQ1_3: Q1.3 R3.2 | length 5.8
  Bottom Layer w1.2: R3.2 Q1.3
NetQ2_3: Q2.3 R4.2 | length 5.6
  Bottom Layer w1.2: R4.2 Q2.3
NetQ3_3: Q3.3 R5.2 | length 6
  Bottom Layer w1.2: R5.2 Q3.3
NetQ4_3: Q4.3 R6.2 | length 5.7
  Bottom Layer w1.2: R6.2 Q4.3
NetQ5_3: Q5.3 R7.2 | length 5.7
  Bottom Layer w1.2: R7.2 Q5.3
NetQ6_3: Q6.3 R8.2 | length 5.7
  Bottom Layer w1.2: R8.2 Q6.3
NetQ7_3: Q7.3 R9.2 | length 17.1
  Bottom Layer w1.2: Q7.3 194.134,43.18 191.897,40.943 191.897,35.941 194.437,33.401 R9.2
NetQ8_3: Q8.3 R10.2 | length 17.5
  Bottom Layer w1.2: Q8.3 193.88,117.729 191.897,115.746 191.897,109.982 194.056,107.823 R10.2
NetQ9_3: Q9.3 R11.2 | length 17.1
  Bottom Layer w1.2: Q9.3 194.281,65.122 193.85,65.122 191.897,63.17 191.897,58.039 194.183,55.753 R11.2
NetQ10_3: Q10.3 R12.2 | length 17.2
  Bottom Layer w1.2: Q10.3 194.007,140.589 191.897,138.479 191.897,133.223 194.183,130.937 R12.2
NetQ11_3: Q11.3 R13.2 | length 17.2
  Bottom Layer w1.2: Q11.3 194.134,89.154 191.897,86.917 191.897,82.042 194.564,79.375 R13.2
NetQ12_3: Q12.3 R14.2 | length 17.4
  Bottom Layer w1.2: Q12.3 194.007,163.449 191.897,161.339 191.897,156.083 194.31,153.67 R14.2
Shade1: R7.1 U1.12 | length 30.3
  Bottom Layer w0.5: R7.1 117.475,94.617 117.983,95.125 117.985,95.125 122.494,99.634 U1.12
Shade2: R8.1 U1.9 | length 92
  Bottom Layer w0.5: R8.1 143.51,167.132 150.241,160.401 150.241,109.22 148.336,107.315 145.722,107.315 U1.9
Shade3: R13.1 U1.29 | length 48.6
  Bottom Layer w0.5: U1.29 171.448,104.773 180.848,114.173 185.166,114.173 191.135,108.204 191.135,98.044 198.898,90.281 198.9,90.281 199.644,89.537 R13.1
Shade4: R14.1 U1.37 | length 62.4
  Bottom Layer w0.5: U1.37 174.498,128.53 174.498,155.321 185.42,166.243 197.358,166.243 199.261,164.34 199.263,164.34 199.771,163.832 R14.1
Water1: R3.1 U1.15 | length 59
  Bottom Layer w0.5: R3.1 117.602,49.195 132.842,64.435 132.842,86.487 138.369,92.014 U1.15
Water2: R4.1 U1.11 | length 69.1
  Bottom Layer w0.5: R4.1 124.714,122.047 127.889,125.222 127.889,133.223 130.429,135.763 135.636,135.763 138.303,133.096 138.303,104.521 140.65,102.174 U1.11
Water3: R9.1 U1.27 | length 90.9
  Bottom Layer w0.5: U1.27 171.188,99.693 181.985,110.49 184.15,110.49 187.96,106.68 187.96,55.418 198.922,44.456 199.517,43.861 R9.1
Water4: R10.1 U1.30 | length 44.1
  Bottom Layer w0.5: U1.30 171.321,107.313 178.816,114.808 178.816,121.793 183.515,126.492 191.135,126.492 198.898,118.729 198.9,118.729 199.644,117.985 R10.1
pads on no net: RL1.2 RL2.2 RL3.2 RL4.2 RL5.2 RL6.2 RL7.2 RL8.2 RL9.2 RL10.2 RL11.2 RL12.2 U1.1 U1.2 U1.7 U1.8 U1.16 U1.17 U1.18 U1.20 U1.21 U1.22 U1.32 U1.33 U1.34 U1.35 U1.36 U1.38

## Polygon pours and split planes (outlines as drawn)
no net on Internal Plane 1 (split plane): 264.412,0.51 53.723,0.51 53.723,172.845 264.412,172.845

## Silkscreen, mask and mechanical layers (free items; w line width, h text height)
Top Overlay:
  text "GND" at 68.453,165.194 h3 r180
  text "12V Shade4" at 249.047,163.99 h3
  text "12V Shade2" at 68.707,155.923 h3 r180
  text "GND" at 248.793,154.465 h3
  text "GND" at 69.088,142.842 h3 r180
  text "12V Fan4" at 249.047,141.128 h3
  text "12V Fan2" at 68.707,133.446 h3 r180
  text "GND" at 249.047,131.351 h3
  text "GND" at 68.58,119.982 h3 r180
  text "12V Water4" at 248.666,118.141 h3
  text "12V Water2" at 69.088,110.713 h3 r180
  text "GND" at 249.428,107.602 h3
  text "GND" at 68.199,93.82 h3 r180
  text "12V Shade3" at 248.539,90.711 h3
  text "12V Shade1" at 68.961,83.279 h3 r180
  text "GND" at 249.047,81.44 h3
  text "GND" at 68.58,70.071 h3 r180
  text "12V Fan3" at 248.92,67.978 h3
  text "12V Fan1" at 68.58,60.294 h3 r180
  text "GND" at 248.539,58.58 h3
  text "GND" at 68.834,46.957 h3 r180
  text "12V Water3" at 248.92,45.499 h3
  text "12V Water1" at 68.58,37.434 h3 r180
  text "GND" at 249.174,36.228 h3
  text "LucPac" at 193.167,7.316 h20
  text "GND" at 165.575,6.477 h3 r90
  text "220V AC" at 155.034,4.188 h3 r90

## Text inside footprints (layer, text, board x,y; h text height)
R1: Top Overlay "200R" at 149.344,36.576 h2.8
R2: Top Overlay "200R" at 169.41,38.354 h2.8 r180
R3: Top Overlay "200R" at 116.713,45.593 h2.8 r270
R4: Top Overlay "200R" at 116.713,118.745 h2.8 r270
R5: Top Overlay "200R" at 116.713,68.834 h2.8 r270
R6: Top Overlay "200R" at 116.713,141.732 h2.8 r270
R7: Top Overlay "200R" at 116.586,91.313 h2.8 r270
R8: Top Overlay "200R" at 116.713,163.83 h2.8 r270
R9: Top Overlay "200R" at 198.628,40.259 h2.8 r270
R10: Top Overlay "200R" at 198.755,114.681 h2.8 r270
R11: Top Overlay "200R" at 198.628,62.611 h2.8 r270
R12: Top Overlay "200R" at 198.755,137.795 h2.8 r270
R13: Top Overlay "200R" at 198.755,86.233 h2.8 r270
R14: Top Overlay "200R" at 198.882,160.528 h2.8 r270
U1: Top Overlay "USB" at 155.761,78.806 h2.03; Top Overlay "ESP32-devkit-v1-38pin" at 159.952,89.982 h2.03 r90